# Altium PCB simple.PcbDoc
Units mm, origin at the board's own origin, x right, y up, seen from the top; angles counter-clockwise.
Board outline 60 x 40 mm, 2 copper layers (Top Layer, Bottom Layer); 3 components, 4 nets, 4 pads, 2 vias.
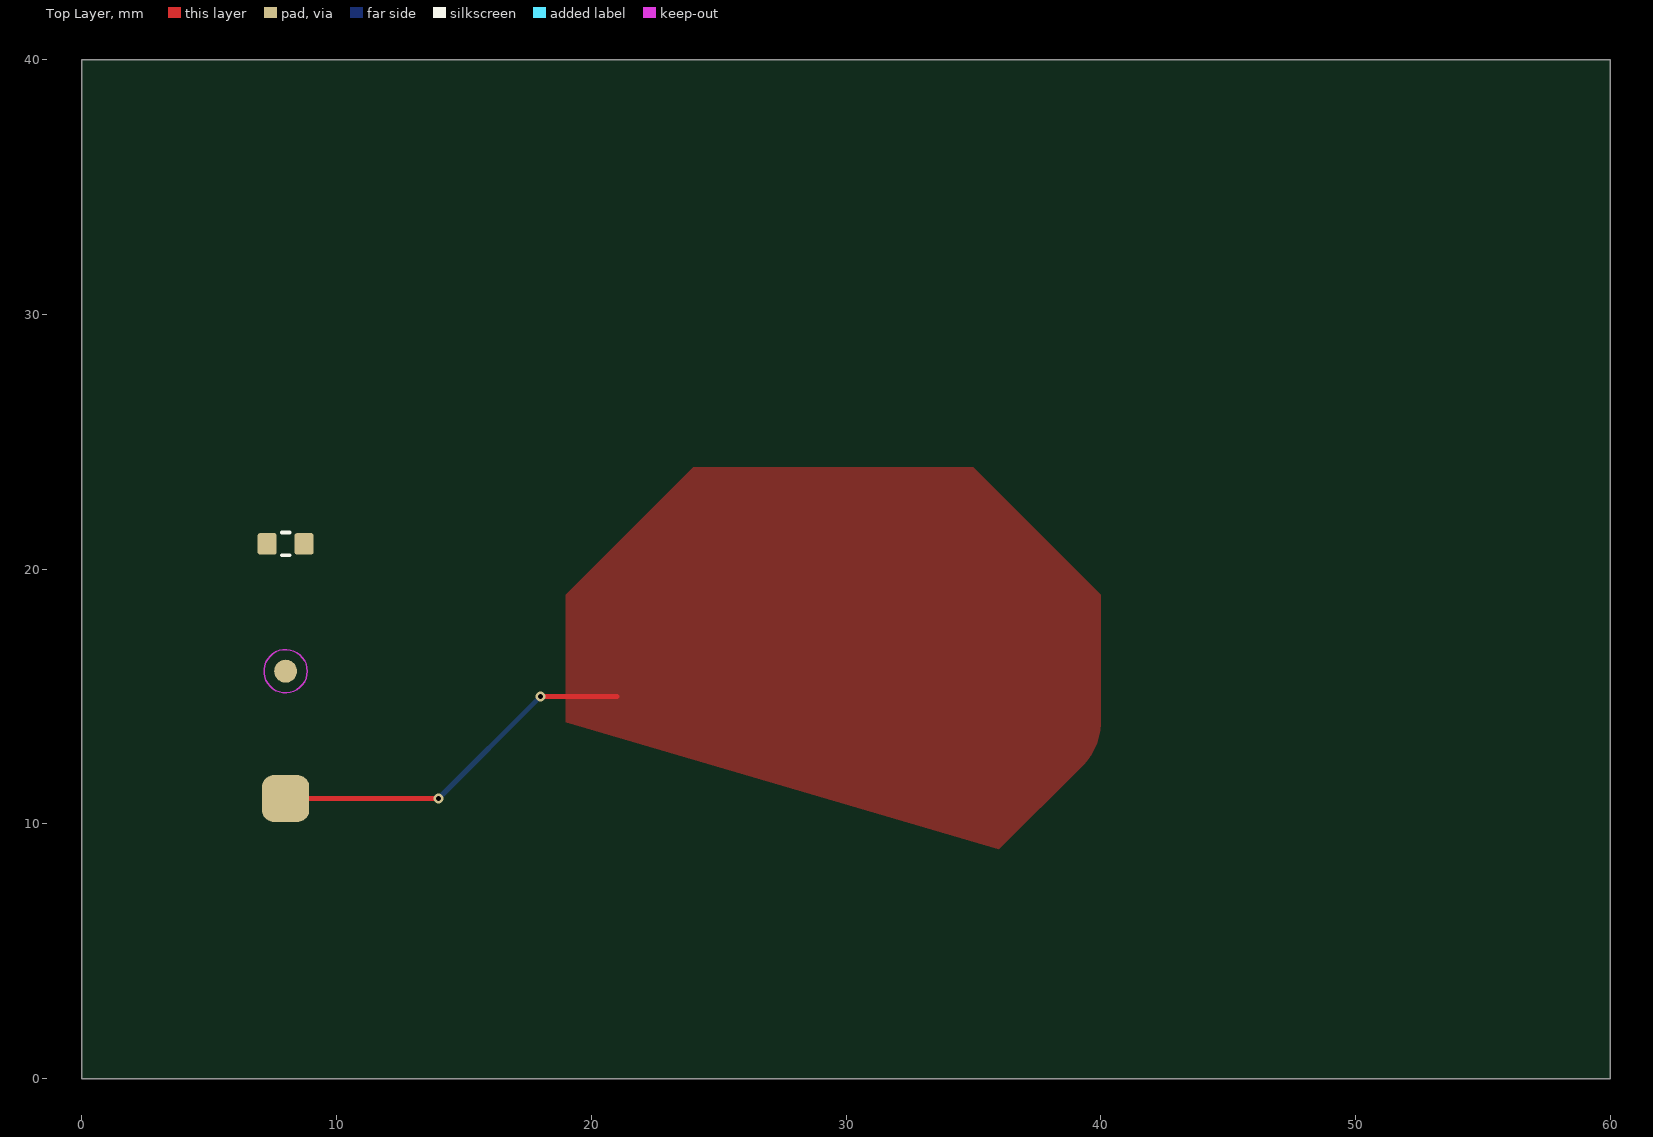
[diagram p0: Top Layer view]
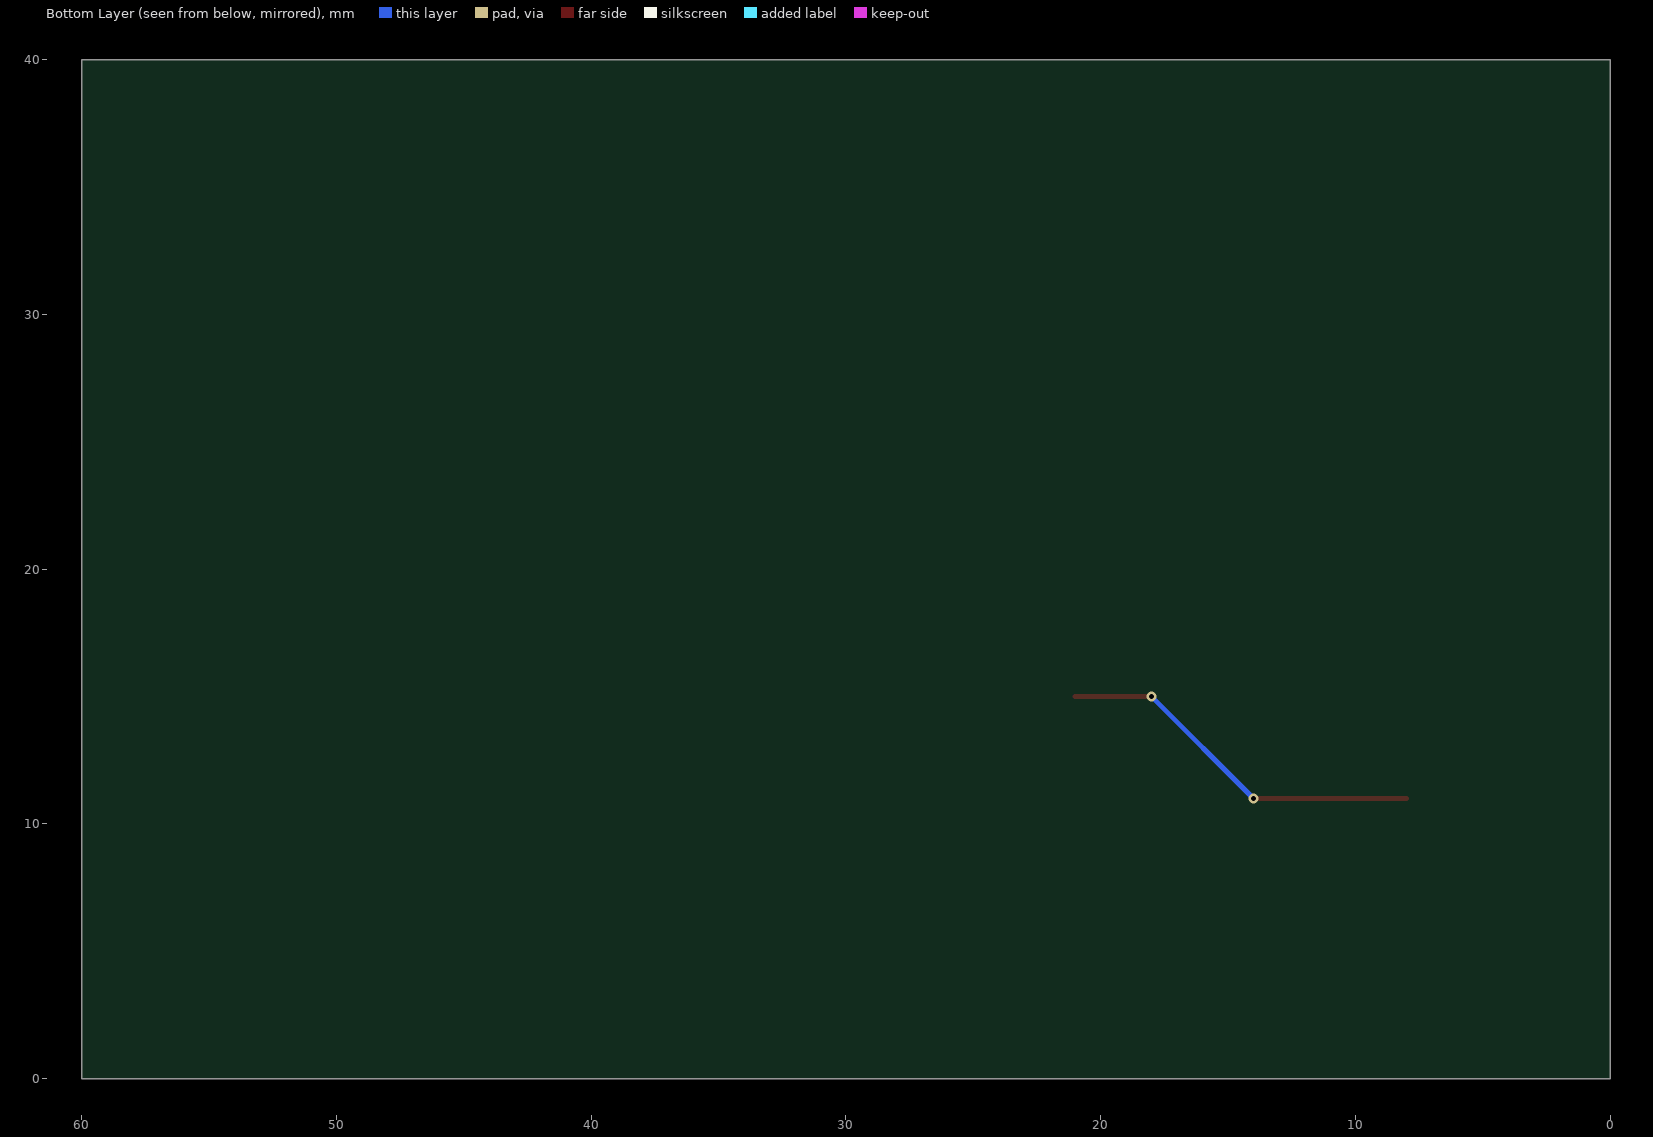
[diagram p1: Bottom Layer view, seen from below]

## Layer stack, top to bottom
Top Solder: solder mask 0.0102, Solder Resist, Dk 3.5
Top Layer: signal copper 0.0356
Dielectric 1: dielectric 0.32, FR-4, Dk 4.8
Bottom Layer: signal copper 0.0356
Bottom Solder: solder mask 0.0102, Solder Resist, Dk 3.5

## Board outline
0,0 0,40 60,40 60,0

## Design rules (kind name [scope] priority, off if disabled: settings)
Clearance [All] p1: gap=0.2 ignorepadtopadclearanceinfootprint=FALSE
PolygonConnect [All] p1: connectstyle=Relief reliefconductorwidth=0.254 reliefentries=4 polygonreliefangle="90 Angle" airgapwidth=0.254
RoutingVias [All] p1: holewidth=0.2 width=0.4 viastyle="Through Hole" minholewidth=0.2 minwidth=0.4 maxholewidth=0.2 maxwidth=0.4
SolderMaskExpansion [All] p1: expansion=0.102 istentingtop=FALSE
Width [All] p1: maxlimit=0.2 minlimit=0.2 preferedwidth=0.2
30 further rules are at their usual default settings.

## Components (designator, comment, footprint, x,y, rotation, side; value= is the part's Value field where it differs from the comment)
? "" TPS180 8,11 r0 top
? "" FID90X190 8,16 r0 top
? "" CAPC1608X09L 8,21 r0 top

## Footprints (in the part's own frame and the unit in brackets; to place one, negate y for a bottom-side part, rotate by r counter-clockwise, add the part's x,y. Pads: shape width x height; smd on the part's side, far side on the other; paste and mask are expansions set on the pad)
CAPC1608X09L [mm] "Chip Capacitor, 2-Leads, Body 1.55x0.80mm, IPC High Density"
  rrect25% 0.75x0.84 smd: 1(-0.725,0) 2(0.725,0)
  silkscreen extent -0.15,-0.45 0.15,0.45, body extent -0.8,-0.45 0.8,0.45, height 0.9
FID90X190 [mm] "Fiducial 0.90mm diameter, 1.90mm mask opening diameter"
  round 0.9 smd paste-9 mask+0.5: 1(0,0)
  Top Layer pour cut-out: 0,-0.975 0.373,-0.901 0.689,-0.689 0.901,-0.373 0.975,0 0.975,0 0.901,0.373 0.689,0.689 0.373,0.901 0,0.975 0,0.975 -0.373,0.901 -0.689,0.689 -0.901,0.373 -0.975,0 -0.975,0 -0.901,-0.373 -0.689,-0.689 -0.373,-0.901 0,-0.975
  Top Layer keep-out circle w0.05: c0,0 r0.85
TPS180 [mm] "1.80x1.80 Testpoint"
  rrect50% 1.85x1.85 smd paste-100 mask-0.05: 1(0,0)
  body extent -0.92,-0.92 0.92,0.92, height 0.03

## Via types
v1: diameter 0.4, hole 0.2, Top Layer to Bottom Layer, tented both sides, 2 vias

## Nets (pads, with @x,y where several pads share a name; then routed paths per layer and width w, separated by ;. In a path a pad name is that pad's centre, name@x,y a point inside that pad or via, vN(x,y) a via of type N, cw(c..) or ccw(c..) an arc to the next point about the centre after c; other vN are vias at no path point)
Net1: ?.1@8,11 | length 14.7
  Top Layer w0.2: ?.1@8,11 v1(14,11) ; v1(18,15) 21,15
  Bottom Layer w0.2: v1(14,11) v1(18,15)
Net2: 
Net3: 
Net4: 
pads on no net: ?.1@7.275,21 ?.1@8,16 ?.2

## Polygon pours and split planes (outlines as drawn)
Net1 on Top Layer "NET1_L01_P000" (solid, pour order 0): 19,19 24,24 35,24 40,19 40,14.052 cw(c37.46,14.052) 39.256,12.256 36,9 19,14

## Silkscreen, mask and mechanical layers (free items; w line width, h text height)
Mechanical 1:
  the board outline again, w0.2